# Altium PCB V3.2_Board.PcbDoc (part 9 of 9)
Units mil, origin at the board's own origin, x right, y up, seen from the top; angles counter-clockwise.
Board outline 7795.28 x 4881.89 mil, 2 copper layers (Top Layer, Bottom Layer), stack 57 mil thick; 419 components, 273 nets, 1244 pads, 414 vias.
Unrouted connection lines stored in the file: 3.
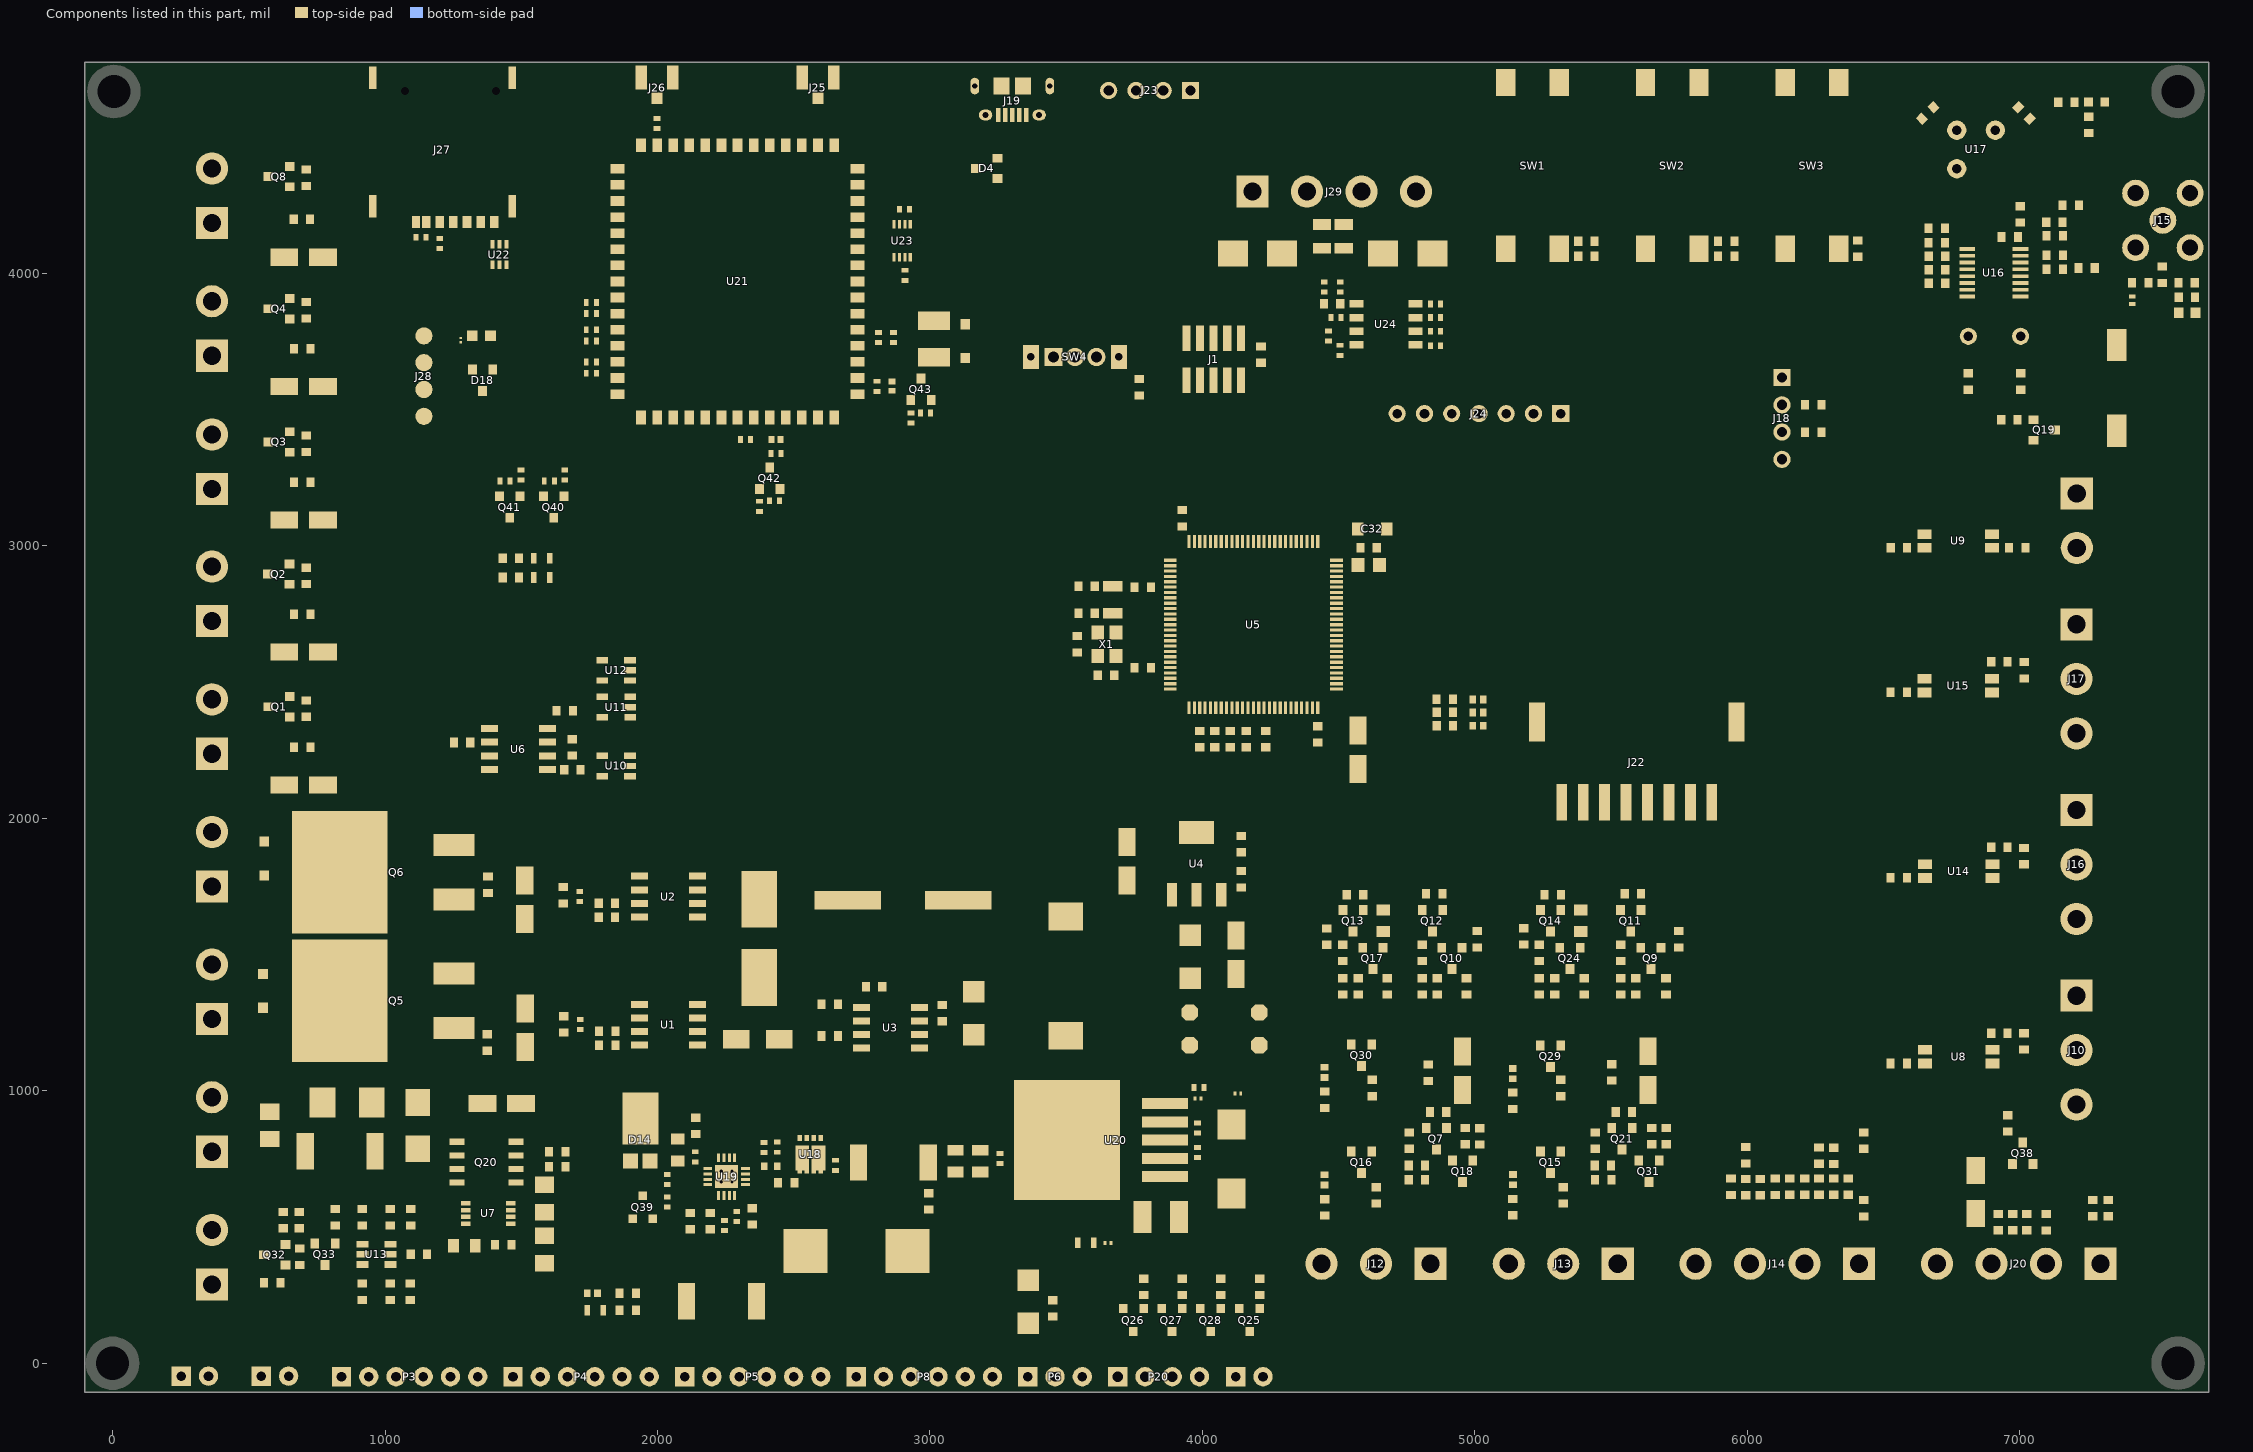
[diagram p5: the components of this part, seen from the top]

## Other copper
Top Layer:
  rectangle net 3V3: 3898.5,2992.02 3954.13,3086
  rectangle net 3V3: 3460.65,1862.08 3599.76,2437.64
  rectangle net 3V3: 6934.78,895 6983.99,1018
  rectangle net 5V: 2810,1364.5 2844,1576
  rectangle net 5V: 2810,1519.22 3005,1576
  region net GND: 1962.09,4762.02 1916.85,4762.02 1916.85,4663.07 1962.09,4663.07
  region net GND: 2556.1,4762.02 2510.86,4762.02 2510.86,4675.41 2556.1,4675.41
  rectangle net GND: 4026.04,3679.48 4232.55,3701.89
  rectangle net GND: 4197.55,3650 4232.55,3701.89
  rectangle net GND: 4197.55,3650 4638,3679.48
  region net GND: 5923.3,2124.93 5771.31,2124.93 5771.31,1986 5923.3,1986
  rectangle net VCC: 5265,1986 5416.98,2124.93
  rectangle net GND: 4717.62,4221.26 4898.72,4358.3
  region net GND: 5148.56,4358.3 4778.1,4358.3 4778.1,3959 5148.56,3959
  rectangle net GND: 3926.04,4025.27 4166.57,4119.76
  region net GND: 3955.96,4119.76 3926.04,4119.76 3926.04,3714.3 3955.96,3714.3
  region net GND: 4105.96,4119.76 4026.04,4119.76 4026.04,3686.89 4105.96,3686.89
  region net 3V3: 4864.72,3937 4864.72,3721.5 4892.28,3721.5 4892.28,3937
  rectangle net RS485/RS232/T.TXD/RS485/RS232/T: 4673.02,3873.7 4853.38,3901.26
  rectangle net 3V3: 4556,3696.5 4590.34,3732
  region net GND: 4523.14,3670 4523.14,3708.02 4450.16,3708.02 4450.16,3670
  region net 3V3: 4479.66,3850.98 4126.04,3850.98 4126.04,3818.98 4479.66,3818.98
  rectangle net GND: 4450.16,3690.02 4475.16,3763
  rectangle net NetR61_1: 4396,3869.98 4461.16,3940
  region net NetR87_1: 4522.16,3820.48 4522.16,3940 4490.16,3940 4490.16,3820.48
  region net NetR87_1: 4590.34,3851.74 4499.54,3851.74 4499.54,3820.48 4590.34,3820.48
  region net NetR61_1: 4590.34,3801.26 4450.16,3801.26 4450.16,3773.7 4590.34,3773.7
  region net 3V3: 4590.34,3751.26 4492.66,3751.26 4492.66,3723.7 4590.34,3723.7
  rectangle net RS485/RS232/T.RXD/RS485/RS232/T: 4755.7,3683 4846.5,3751.26
  rectangle net RE/DE/RS485/T: 4710,3773.7 4846.5,3851.26
  region net NetD5_2: 4473.06,4135.51 4229.73,4135.51 4229.73,3959 4473.06,3959
  rectangle net NetD8_2: 4484.67,3959 4728,4135.51
  rectangle net 3V3: 4126.04,3714.3 4232.55,3850.98
  rectangle net GND: 3691.76,1677.04 3906.56,1822.71
  rectangle net CII: 2647.11,1293.47 2780,1399.5
  rectangle net VCC#P: 668.5,530.04 744.62,595.28
  rectangle net VCC#P: 1444.38,624.36 1620,793.5
  rectangle net VCC#P: 1452.46,665.52 1507.58,837.96
  rectangle net VCC#12: 2212,1155.9 2374.02,1222.83
  rectangle net VCC: 1587,807.34 1677,866.55
  rectangle net VCC#P: 1443.87,751.52 1550.29,984.86
  rectangle net RST_GSM: 2394.32,3270 2429.75,3491.79
  rectangle net 3V3: 4390,1765 6540.57,1968
  region net NetQ33_1: 835.68,520.93 800.68,520.93 800.68,420.86 835.68,420.86
  rectangle net GND: 5937.41,4041.19 6174.12,4079.86
  rectangle net GND: 5424.05,4041.19 5661.34,4079.86
  rectangle net GND: 2035,4675.41 2077.78,4762.02
  rectangle net GND: 726.23,420.58 773.81,457.08
  rectangle net GND: 2580.92,1299.86 2621.92,1687
  rectangle net GND: 3685.45,598.91 3813.4,635
  rectangle net GND: 3746.47,477.07 3813.4,635
  rectangle net 3V3: 3320.74,107.25 3550,185.99
  rectangle net BAT: 306,679 738.54,853
  rectangle net CRNT_SNS.IP+_2: 1359.33,1916 1419,1989.52
  rectangle net CRNT_SNS.IP+_1: 1364,1426 1419,1510
  rectangle net VCC#P: 1444.38,579.58 1480.02,837.96
  rectangle net WBUS2: 5573.5,1398 5662.14,1464.26
  region net GND: 4976.72,1414.63 4976.72,1445.65 4959.01,1445.65 4959.01,1414.63
  rectangle net VCC: 553.52,2558.5 701,2667.19
  rectangle net SW_2: 5787.32,4041.19 5907.41,4139.61
  rectangle net GND: 3120,4640 3490,4675.81
  rectangle net GND: 3188.25,4656.83 3292.68,4717.85
  rectangle net GND: 3195,4656.83 3416.64,4717.85
  rectangle net GND: 2623.54,4675.41 2668.78,4762.02
  rectangle net GND: 2509.97,4660 2556.1,4690
  rectangle net GND: 2623.54,4660 2668.78,4685
  rectangle net GND: 2035,4660 2077.86,4685
  rectangle net GND: 1919.51,4660 1961.21,4690
  rectangle net GND: 1910,4448.48 1961.23,4675
  rectangle net GND: 2035,4415 2095,4675
  rectangle net GND: 710,2730 775,2795
  rectangle net GND: 941.22,4718.57 1480.59,4764.23
  rectangle net GND: 3523.61,2506.86 3639.27,2623.36
  rectangle net VCC: 2110.92,1254.24 2268,1487
  rectangle net S_VIN: 1776,683.5 2023.5,769.2
  rectangle net S_VIN: 1900.88,683.5 2048.5,701.5
  rectangle net 5V: 2981.62,1519.22 3561.1,1733
  rectangle net 5V: 3435.12,1519.56 4161.31,1638.87
  rectangle net VCC: 5056,527.89 5156.5,557.89
  rectangle net NetLED4_1: 5121.5,587.89 5156.5,667.39
  rectangle net 3V3: 4725,1398 4824.47,1491
  rectangle net 3V3: 4390,1571 4474.5,1627
  rectangle net 3V3: 5437,1398 5552.47,1491
  rectangle net 3V3: 5437,1398 5477,1800
  rectangle net 3V3: 4715,1398 4750,1800
  rectangle net VCC: 5419.79,950.95 5809,1054.32
  rectangle net VCC: 5419.79,823.74 5542,1054.32
  rectangle net 3V3: 5112,1581.28 5179,1800.28
  rectangle net 3V3: 5112,1571.28 5196.5,1627.28
  rectangle net 5V: 4050.26,1519.56 4161.31,1761.68
  rectangle net 3V3: 3462,1862.08 3978.41,1990.03
  rectangle net 3V3: 3932.11,1677.04 4026,1950
  rectangle net GND: 3900.61,1362.08 4161.31,1480.68
  rectangle net BAT: 2392.32,514.64 2442.88,632.04
  rectangle net GSM_PWR: 4135.51,915.14 4157.5,997.91
  rectangle net GND: 3969.36,782.62 3994.36,818.99
  rectangle net GSM_BUCK_EN: 3880.33,477.07 3947.26,677.5
  rectangle net GSM_BUCK_EN: 3777.69,665.05 3947.76,752.06
  rectangle net GSM_BUCK_EN: 3931.98,731.98 3994.36,763.62
  rectangle net NetC81_2: 2049.88,722.64 2201.02,748.14
  rectangle net NetC81_2: 2168.74,708.81 2201.02,748.14
  rectangle net AGND: 1967,160.07 2138.54,514.19
  rectangle net DRV_OUTB1: 1351.73,2316.38 1422.26,2341.97
  rectangle net VCC: 556,2070.54 701,2173.53
  rectangle net VCC: 630.13,2223.5 691,2292.64
  rectangle net VCC: 622,2696 691,2785.5
  rectangle net GSM_PWR: 2713.22,3773.59 3147.38,3869.74
  rectangle net GSM_PWR: 2713.22,3773.59 3147.38,3810.69
  region net GND: 4421.57,2286.33 4390.55,2286.33 4390.55,2268.61 4421.57,2268.61
  rectangle net 3V3: 5017.99,2325.83 5096,2483
  rectangle net GND: 5709.17,1404.52 5735.2,1422.24
  rectangle net VCC: 6929.97,1868.55 7133,1943
  rectangle net VCC: 444,4035.65 600.11,4083.17
  rectangle net VCC: 434.11,3561.54 600.11,3609.07
  rectangle net VCC: 434.11,3071.54 600.11,3119.07
  rectangle net VCC: 556,2586.5 600.11,2634.03
  rectangle net VCC: 556,2098.54 600.11,2146.07
  rectangle net GND: 5218.5,1338 5552.5,1368
  region net GND: 5438.37,734.06 5407.35,734.06 5407.35,716.34 5438.37,716.34
  region net GND: 4755.67,734.06 4724.65,734.06 4724.65,716.34 4755.67,716.34
  rectangle net VCC: 4359.42,526 4465.86,558
  rectangle net VCC: 5570.73,1311.06 5718.9,1368.25
  rectangle net VCC: 6930.18,2550.09 7123,2611.95
  rectangle net VCC: 6929.97,1188 7127,1248.29
  rectangle net VCC: 2212,1297 2268,1799
  rectangle net VCC: 2115.03,1723.36 2268,1966
  rectangle net ANT: 7046,3947.5 7427,3982.5
  rectangle net MEM_SAVER: 365.05,3360.5 593.43,3450.5
  rectangle net GND: 4625,2976.06 4706,3085.43
  rectangle net VDDA: 4502.01,2940.96 4595,2976.06
  rectangle net VDDA: 4468.48,2943.25 4595.25,3085.43
  rectangle net 5V: 1702.93,2142.6 1818.89,2195.67
  rectangle net 3V3#: 7195,3997.11 7232,4267
  rectangle net CRNT_VOUT.VIOUT2: 1635.92,1669.75 1799.64,1704.75
  rectangle net CRNT_VOUT.VIOUT1: 1637.92,1198.47 1800.64,1235.75
  rectangle net LED_SIG.R_CNTRL: 3766.73,185.11 3801.73,265
  rectangle net TDS_IN.TEMP_SNS: 4214.75,2305.85 4249.75,2335.85
  rectangle net IO_C9: 5010.06,847.27 5026.71,896
  rectangle net HEAT_CNTRL: 5694.52,848.27 5711.16,897
  rectangle net GND: 1823.45,3440.61 1957.31,3574.47
  rectangle net XOUT: 3658.95,2506.86 3706.2,2620.65
  rectangle net XIN: 3523.61,2653.36 3639.27,2707.26
  rectangle net OSC_OUT: 3590,2732.95 3706.43,2772.32
  rectangle net OSC_IN: 3590,2831.38 3706.43,2870.75
  rectangle net ENA#: 1351.73,2163.17 1672.93,2193.17
  rectangle net 5V: 1836,2171.6 1857.41,2517.44
  region net VDD_EXT: 2897.45,4266 2879.45,4266 2879.45,4236 2897.45,4236
  region net GND: 2862.68,3983.35 2862.68,3965.35 2910.32,3965.35 2910.32,3983.35
  rectangle net GND: 1274,3727.56 1283.45,3746.98
  rectangle net STATUS: 1647.01,3268.86 1690,3286.86
  rectangle net NETLIGHT: 1487.01,3268.86 1530,3286.86
  rectangle net GND: 2623.54,4420 2673,4675
  rectangle net NetQ41_1: 1450.35,3225.36 1511.65,3250.36
  rectangle net NetQ40_1: 1612.5,3225.5 1672.65,3250.5
  rectangle net GND: 2955.94,3658.61 3147.38,3754.59
  rectangle net NetLED12_1: 1476,2863.88 1555.32,2903.25
  rectangle net GSM_PWR: 1417,2866.07 1447,2971.5
  rectangle net NetLED13_1: 1475,2934.31 1555.32,2973.69
  rectangle net NetQ43_1: 2913.51,3474.64 2973.11,3499.64
  rectangle net GND: 2988.32,3474.64 3020.6,3553.6
  rectangle net NetQ43_1: 2913.51,3478.14 2945.8,3553.6
  rectangle net GND: 2713.22,3539.03 2874.56,3575.86
  rectangle net PWRKEY: 2713.22,3594.86 3063.2,3633.52
  rectangle net NetQ41_1: 1479.37,3163.62 1511.65,3246.86
  rectangle net GND: 1565.57,3163.62 1597.85,3250.5
  rectangle net NetQ40_1: 1640.37,3163.62 1672.65,3246.86
  rectangle net GND: 1404.57,3163.62 1436.85,3250.36
  rectangle net GND: 2713.22,3657.14 3147.38,3754.59
  rectangle net GND: 941.22,4204.79 1034,4763
  rectangle net GND: 1453.03,4204.79 1480.59,4752
  rectangle net GND: 2505.53,4415 2556.1,4675
  rectangle net NetQ42_1: 2358.57,3154.5 2390.85,3227.1
  rectangle net NetQ42_1: 2358.57,3153 2420.25,3178
  rectangle net GND: 2433.37,3153 2465.65,3227.1
  rectangle net GND: 2276.21,3377.89 2314.11,3491.79
  rectangle net VDD_EXT: 2333.11,3377.86 2370.7,3491.79
  rectangle net GND: 2441.02,3190.88 2465.65,3403.35
  rectangle net NetC98_2: 1766.61,3657.14 1874.63,3687.36
  rectangle net NetC97_2: 1766.61,3775.25 1874.63,3810.69
  rectangle net NetC98_2: 1766.61,3621.02 1784.61,3687.36
  rectangle net NetD17_2: 1142.73,3758.67 1339.95,3783.5
  rectangle net GND: 1729.61,3780.47 1747.61,3864.52
  rectangle net NetC97_2: 1766.61,3739.13 1784.61,3805.47
  rectangle net NetC96_2: 1766.61,3839.86 1784.61,3905.86
  rectangle net NetC96_2: 1766.61,3834.31 1874.63,3869.74
  rectangle net SIM_VDD: 1142.06,4119.08 1216.81,4144.86
  rectangle net SIM_CD: 1098.66,4119.08 1128.66,4205.31
  rectangle net SIM_VDD: 1185.32,4119.08 1216.81,4205.31
  region net GND: 5606.97,1533.37 5580.94,1533.37 5580.94,1515.65 5606.97,1515.65
  region net GND: 5532.97,1671.61 5501.94,1671.61 5501.94,1653.9 5532.97,1653.9
  region net GND: 5238.71,1671.61 5207.68,1671.61 5207.68,1653.9 5238.71,1653.9
  region net GND: 4805.34,1671.61 4774.31,1671.61 4774.31,1653.9 4805.34,1653.9
  region net GND: 4513.97,1666.61 4482.94,1666.61 4482.94,1648.9 4513.97,1648.9
  region net GND: 4876.67,1533.37 4852.65,1533.37 4852.65,1515.65 4876.67,1515.65
  rectangle net NetQ12_3: 4789.47,1566.28 5026.5,1602.5
  region net GND: 5234.37,1360.48 5203.35,1360.48 5203.35,1342.76 5234.37,1342.76
  region net GND: 4507.12,1351.37 4507.12,1320.35 4524.84,1320.35 4524.84,1351.37
  region net GND: 5238.57,1174.48 5207.54,1174.48 5207.54,1156.76 5238.57,1156.76
  region net GND: 4544.97,1178.06 4513.94,1178.06 4513.94,1160.35 4544.97,1160.35
  region net GND: 5238.97,784.85 5207.94,784.85 5207.94,767.13 5238.97,767.13
  rectangle net 3V3: 7142.21,4169.5 7172.21,4266.5
  region net VCC: 7284.61,600.99 7284.61,648.72 7249.61,648.72 7249.61,600.99
  region net VCC: 6445.5,600.63 6445.5,648.36 6410.5,648.36 6410.5,600.63
  rectangle net TXIN2: 5519.83,1714.5 5565,1732
  rectangle net TXIN1: 4790.83,1714.5 4836,1732
  rectangle net VCC#M: 1165.28,543 1251.11,570.53
  rectangle net VCC#M: 1165.28,543 1208,723.96
  rectangle net VCC#M: 931.46,701.52 1291.05,844.93
  rectangle net 5V: 1775.99,2358.96 1857.82,2382.58
  rectangle net INB_1#: 1564.33,2316.38 1645,2457.39
  rectangle net GND: 1675,2266.38 1705.43,2412.5
  rectangle net 5V: 1775.58,2142.6 1857.41,2195.22
  rectangle net 5V: 1773.58,2493.82 1855.42,2517.44
  rectangle net INA_1#: 1564.33,2214.86 1705.43,2244.86
  rectangle net GND: 1564.33,2266.38 1705.43,2304.86
  rectangle net ENA#: 1773.58,2554.84 1818.89,2592.24
  rectangle net 5V: 1298,2266.38 1414.72,2291.97
  rectangle net VOUT_B: 510.82,-84.9 681.68,-12.03
  rectangle net VOUT_A: 216.82,-84 389,-12.03
  rectangle net NetD6_2: 904.31,900.88 1165.28,1011.12
  rectangle net NetLED11_1: 3591.69,422.31 3648.49,461.69
  rectangle net AGND: 2126,418 2303,460
  rectangle net AGND: 2278.29,477.64 2303.29,529.14
  rectangle net AGND: 2233.26,437 2303.29,495.64
  rectangle net PH: 2591.6,814.83 2607.34,855.83
  rectangle net NetC41_2: 1870.96,802.64 2099.88,842.64
  rectangle net NetC41_2: 2565.69,736.64 2675.38,799.84
  rectangle net PH: 2487.88,431 2548.29,799.84
  rectangle net NetR122_1: 2103.38,536.64 2201.02,566.64
  rectangle net NetSB7_1: 1444.38,417.86 1479.11,511.08
  rectangle net IN-: 997.27,277.43 1041.36,374.4
  rectangle net NetC87_1: 2706.43,510 2769.42,803.57
  rectangle net BAT: 2962.34,761.14 3269.38,876
  rectangle net BAT: 2962.34,609 3025.33,803.57
  rectangle net VREF: 2243.93,599.76 2263.62,632.04
  rectangle net NetLED10_2: 2218.74,584.02 2229.76,632.04
  rectangle net AGND: 1967,485 2048.5,582.26
  region net GND: 4102.5,997.91 4102.5,980.62 4124.49,980.62 4124.49,997.91
  region net ADJ: 3977.85,932.77 3977.85,1024.62 3777.69,1024.62 3777.69,932.77
  region net GSM_PWR: 4105.36,865.84 4105.36,906 3742,906 3742,865.84
  region net GND: 3994.36,782.62 3994.36,853.87 3668,853.87 3668,782.62
  rectangle net GND: 2929.62,1293.47 3199.37,1403.47
  rectangle net GND: 2319.06,1598.53 2820.6,1807.19
  rectangle net GSM_BUCK_EN: 2397.64,1193.47 2553.11,1519.79
  rectangle net NetC20_2: 2929.62,1240.36 3063.5,1270.36
  rectangle net GSM_BUCK_EN: 2397.64,1236.78 2780.02,1276.36
  rectangle net "IPK SNS": 2717.02,1143.47 2780.02,1219.06
  rectangle net NetD1_1: 2929.62,1193.47 3187.48,1219.06
  rectangle net "IPK SNS": 2717.02,1143.47 2992.62,1169.06
  rectangle net "IPK SNS": 2647.11,1143.47 2780.02,1219.06
  rectangle net GND: 4125.61,1791.36 4160.61,1890.39
  rectangle net 3V3: 4013.99,1905.39 4451,1990
  rectangle net NetD1_1: 3120.63,1150.68 3561.1,1254.36
  rectangle net GSM_BUCK_EN: 2397.64,1155.9 2617.11,1271.36
  rectangle net NetQ39_3: 1930.2,598.83 2048.5,664.5
  rectangle net NetQ39_3: 2023.5,609.26 2048.5,664.5
  rectangle net 5V: 1483.14,1109.43 1967.49,1136.36
  rectangle net VREF: 2176.38,476.64 2211.38,523.64
  rectangle net GND: 3059.88,681.64 3354,742.14
  rectangle net VCC#12: 537.42,529.92 644.5,595.28
  rectangle net VCC_M: 609.5,405.43 715.5,510
  rectangle net VSS: 1550.11,437.36 1620.11,584.36
  rectangle net SHDN: 1311.11,406.36 1419.11,456.36
  rectangle net GATE: 1278.59,587.85 1313.59,673.96
  rectangle net VCC#M: 1234.11,553.99 1313.59,570.53
  rectangle net VSS: 1444.38,528.36 1569.53,544.94
  rectangle net VCC#M: 1235.93,502.81 1313.59,519.35
  rectangle net VCC#M: 1235.93,715.52 1291.05,837.96
  rectangle net VCC#M: 1231.11,424.36 1271.11,570.53
  region net NetQ32_1: 795.92,378.34 616.16,378.34 616.16,342.12 795.92,342.12
  region net VCC#12: 573.64,570 537.42,570 537.42,277.5 573.64,277.5
  region net IN+: 939,374.4 894.91,374.4 894.91,277.43 939,277.43
  region net VOUT_A: 939,520.93 859,520.93 859,424.8 939,424.8
  region net IN-: 1110,307.43 997.27,307.43 997.27,277.43 1110,277.43
  region net VCC_M: 1111.77,411.8 997.27,411.8 997.27,386 1111.77,386
  region net VCC_M: 1111.77,520.93 1076.77,520.93 1076.77,381.93 1111.77,381.93
  region net VOUT_B: 1041.36,520.93 959,520.93 959,424.8 1041.36,424.8
  rectangle net NetC87_1: 2920.33,330.93 3015,578.64
  rectangle net NetC87_1: 2706,330.93 2945.56,578.64
  rectangle net BAT: 2330.38,477.64 2442.88,523.64
  rectangle net BAT: 2380.45,477.64 2404.07,659.15
  rectangle net NetR127_1: 2277.79,568.64 2365.38,632.04
  rectangle net BAT: 2306.53,650.76 2392.26,659.15
  rectangle net NetC41_2: 2565.69,696.72 2616.48,799.84
  rectangle net VREF: 2176.38,508.64 2253.93,523.64
  rectangle net NetR127_1: 2277.79,548.14 2365.38,583.64
  rectangle net VREF: 2248.42,508.64 2259.45,632.04
  rectangle net NetR122_1: 2183.88,536.64 2201.02,655.27
  rectangle net GND: 2122.38,758.72 2183.78,859.64
  rectangle net RESIN_SAVER: 365.05,4336.5 593.43,4426.5
  rectangle net FILL_CNTRL: 632.26,2351.38 728.5,2387.52
  rectangle net GND: 632.26,2417.52 728.5,2462.54
  rectangle net GND: 631.26,2904.52 728.5,2949.54
  rectangle net FLUSH_CNTRL: 631.26,2838.38 728.5,2874.52
  rectangle net MEM_CNTRL: 632.26,3323.38 728.5,3359.52
  rectangle net GND: 632.26,3389.52 728.5,3434.54
  rectangle net GND: 632.26,3879.52 728.5,3924.86
  rectangle net PM_CNTRL: 632.26,3813.38 728.5,3849.52
  rectangle net RS_CNTRL: 632.26,4299.84 728.5,4335.98
  rectangle net GND: 632.26,4365.98 728.5,4408.54
  rectangle net AUTO_FILL: 365.05,2388.5 593.43,2478.5
  rectangle net AUTO_FLUSH: 365.05,2875.5 593.43,2965.5
  rectangle net PROP_MIXING: 365.05,3849.5 593.43,3939.86
  rectangle net 3V3: 3323.82,156 3467.5,185.99
  rectangle net LED_SIG.W_LED_CNTRL: 4193.14,185.11 4228.14,265
  rectangle net B_CNTRL: 4049.73,185.11 4084.73,265
  rectangle net G_CNTRL: 3908.23,185.11 3943.23,265
  rectangle net NetQ24_1: 5383.5,1398 5418.5,1603.76
  rectangle net 3V3: 4390,1581 4457,1800
  rectangle net 3V3: 5160.96,1581 5196.5,1627
  rectangle net 3V3: 4439.5,1581 4474.5,1627
  rectangle net WBUS2: 5307.5,365 5342.5,601
  rectangle net WBUS1: 4620.5,365 4655.5,601
  rectangle net WBUS1: 4638,1643.76 4688,1740.5
  rectangle net WBUS2: 5363,1643.76 5413,1736.5
  rectangle net NetQ17_3: 4485,1701.5 4545,1736.5
  rectangle net WBUS1: 4844.66,1398 4931.84,1464.26
  rectangle net NetQ24_3: 5211,1701.5 5271,1736.5
  rectangle net NetQ24_3: 5275.5,1398 5365.14,1464.26
  rectangle net NetQ17_3: 4554.5,1398 4641.69,1464.26
  rectangle net NetQ9_1: 5667.26,1506.78 5765.5,1543
  rectangle net NetQ11_3: 5517.5,1566.28 5765.5,1602.5
  rectangle net NetQ11_3: 5517.5,1521 5555.86,1602.5
  rectangle net NetQ11_1: 5593.26,1645.02 5625.54,1740.5
  rectangle net NetQ12_1: 4865.63,1645.02 4897.91,1740.5
  rectangle net NetQ12_3: 4789.47,1521 4828.23,1602.5
  rectangle net NetQ10_1: 4935.6,1506.78 5026.5,1543
  rectangle net VCC: 4843,1315.33 5009,1368.12
  rectangle net NetQ24_1: 5363,1506.78 5413,1603.76
  rectangle net NetQ14_1: 5299,1645.02 5331.28,1736.5
  rectangle net RXIN2#: 5161.5,1521 5253.5,1551.28
  rectangle net RXIN2: 5218.5,1397 5253.5,1491
  rectangle net NetQ17_1: 4638,1506 4695.44,1603.76
  rectangle net NetQ13_1: 4574.26,1645.02 4606.54,1736.5
  rectangle net RXIN1#: 4439.5,1521 4533.1,1551
  rectangle net NetQ17_1: 4660.44,1398 4695.44,1543
  rectangle net GND: 4498.1,1338 4824.5,1368
  rectangle net RXIN1: 4498.1,1398 4533.1,1491
  rectangle net IND3: 5124.83,1069.15 5293.74,1105.37
  rectangle net IND4: 4434.19,1072.74 4600.14,1108.96
  rectangle net NetLED6_1: 5121.5,978 5156.5,1056.54
  rectangle net NetLED7_1: 4431.42,982 4466.42,1060.54
  rectangle net IND2: 5125.39,679.52 5294.14,715.74
  rectangle net NetLED5_1: 4430.86,586.89 4465.86,666.39
  rectangle net IND1: 4434.19,679.52 4600.14,715.74
  rectangle net NetQ21_1: 5561,845 5593.54,939.5
  rectangle net NetQ31_1: 5685.04,725.58 5720.04,817.62
  rectangle net NetQ31_3: 5631.5,664.95 5646.5,818.27
  rectangle net NetQ18_3: 4947.5,664.95 4962.5,818.27
  rectangle net AUX_HEATER: 5422.5,772.27 5561.91,802.48
  rectangle net GND: 4739.3,656.08 4772.3,743.08
  rectangle net GND: 5425,656.08 5456,743.08
  rectangle net HEATER: 4798.23,334.59 4874.91,802.48
  rectangle net AUX_HEATER: 5485.23,334.59 5561.91,802.48
  rectangle net VCC: 4729.74,950.95 4986.5,1062.47
  rectangle net HEATER: 4742.3,772.27 4874.91,802.48
  rectangle net VCC: 4729.74,821.84 4864.77,1043
  rectangle net NetQ7_1: 4879.77,845 4912.32,939.5
  rectangle net NetQ18_1: 5001.04,725.58 5036.04,817.62
  rectangle net NetJ14_2: 6192,365 6227.61,633.36
  rectangle net NetR115_1: 6299.17,772 6445.5,807
  rectangle net NetJ14_1: 6373.61,365 6447.17,554.36
  rectangle net NetR111_1: 5976.37,661.36 6011.37,748
  rectangle net NetC79_2: 6245.5,716 6334.17,747
  rectangle net NetC79_2: 6299.17,663.36 6334.17,743
  rectangle net 0-10V: 6192.61,663.36 6280.5,693.36
  rectangle net 4-20mA: 6030.33,661.36 6173.28,693.36
  rectangle net NetC42_1: 5922.5,601.36 6065.33,632.36
  rectangle net NetJ14_2: 6138.28,603.36 6227.61,633.36
  rectangle net NetR112_2: 6245.5,603.36 6387.5,633.36
  rectangle net NetQ38_1: 6955.78,533 6990.78,749.74
  rectangle net NetJ20_2: 7063,368 7130,503
  rectangle net PSW_MCU: 6863,368 6930,503
  rectangle net PSW_MCU: 6804.54,473 6871.46,549.26
  rectangle net PSW_MCU: 6804.54,473 7042.63,503
  rectangle net SW_1: 5274.55,4041.19 5394.05,4139.61
  rectangle net NetJ18_3: 6127.11,3399.86 6227.11,3434.86
  rectangle net NetJ18_2: 6127.11,3499.86 6227.11,3534.86
  rectangle net FLOW_MCU1: 6577.36,1082.17 6676.94,1117.39
  rectangle net FLOW_MCU2: 6570.57,1763.17 6676.94,1799.39
  rectangle net FLOW_MCU3: 6575.57,2444.22 6675.15,2479.43
  rectangle net FLOW_OUT1: 6873.79,1132.03 7208.11,1167.61
  rectangle net FLOW_OUT2: 6874.06,1813.36 7208.11,1848.36
  rectangle net FLOW_OUT3: 6873,2494 7208.11,2529.7
  rectangle net LEVEL_IN: 7005.36,2975.36 7209.11,3010.36
  region net LEVEL_MCU: 6576.36,3010.61 6576.36,2975.17 6675.94,2975.17 6675.94,3010.61
  region net NetR80_1: 6872.79,3010.61 6872.79,2975.17 6975.36,2975.17 6975.36,3010.61
  rectangle net NetQ19_1: 6976.61,3444.9 7068.74,3479.9
  rectangle net NetLS1_2: 7111.26,3362.94 7391.43,3484
  rectangle net RO1: 6985.56,3618 7020.56,3921.39
  rectangle net RO2: 6793.56,3618 6828.56,3921.39
  rectangle net GND: 6651,3945.5 6681,4030.17
  rectangle net SEL1: 6710,4044.5 6741,4130.5
  rectangle net SHDN#: 6973.9,4082.61 7030.98,4201
  rectangle net SEL0: 7082.21,4119.72 7113.21,4204.5
  rectangle net 3V3#: 7143.21,3997.11 7230,4032.11
  rectangle net GND: 7143.21,4048.11 7173.21,4133.72
  rectangle net PATCH: 7564.96,3836.91 7600.4,3930.15
  rectangle net NetC77_2: 7627,3895.15 7658,3982.5
  rectangle net ANT: 6973.9,3957.61 7061.21,3971.39
  rectangle net NetJ15_1: 7505.5,4010 7540.5,4194.36
  rectangle net ANT#: 7457,3947.5 7597,3982.5
  rectangle net NetR5_1: 1830.64,1200.75 1966.53,1235.75
  rectangle net NetQ6_1: 1178.66,1662 1398,1742.48
  rectangle net NetQ5_1: 1178.66,1189 1398,1271.47
  rectangle net VCC: 2115.14,1255.46 2178.13,1331.05
  rectangle net 5V: 1830.64,1109.43 1967.49,1184.75
  rectangle net 5V: 1829.64,1578.43 1965.53,1653.75
  rectangle net 5V: 1481.19,1578.43 1965.53,1605.36
  rectangle net GND: 1483.14,1251.16 1966.85,1353.52
  rectangle net GND: 1481.19,1720.16 1965.53,1822.52
  rectangle net 5V: 1858.19,1149.75 1965.53,1184.75
  rectangle net NetR8_1: 1829.64,1669.75 1965.53,1704.75
  rectangle net 5V: 1857.19,1618.75 1965.53,1653.75
  rectangle net GND: 1902.54,1724.46 1965.53,1800.05
  rectangle net VCC: 2115.14,1724.46 2178.13,1800.05
  rectangle net GND_DRV_2: 306,1576.53 1008.58,1809.09
  rectangle net GND_DRV_1: 306,1105.52 1001.64,1322.04
  rectangle net PS_PWR: 7236.88,305.94 7354.99,554.36
  region net GND: 7638.25,-106.94 7508.07,-106.94 cw(c7508.07,-101.93) 7503.59,-104.18 cw(c7505.79,-99.79) 7502.84,-103.72 cw(c7581.92,2.07) 7581.92,134.15 cw(c7581.92,2.07) 7687.07,81.99 cw(c7683.09,78.96) 7688.1,78.96 7688.1,-106.94
  region net GND: 7688.1,4724.87 7688.1,4594.69 cw(c7683.09,4594.69) 7685.34,4590.21 cw(c7680.95,4592.41) 7684.87,4589.46 cw(c7579.08,4668.53) 7447,4668.53 cw(c7579.08,4668.53) 7499.16,4773.69 cw(c7502.2,4769.71) 7502.2,4774.71 7688.1,4774.71
  region net GND: -52.35,4774.42 77.83,4774.42 cw(c77.83,4769.41) 82.31,4771.66 cw(c80.11,4767.27) 83.06,4771.2 cw(c3.98,4665.41) 3.98,4533.33 cw(c3.98,4665.41) -101.17,4585.49 cw(c-97.19,4588.52) -102.2,4588.53 -102.2,4774.42
  region net GND: -107.18,-57.33 -107.18,72.85 cw(c-102.17,72.85) -104.42,77.33 cw(c-100.03,75.13) -103.95,78.08 cw(c1.84,-1) 133.91,-1 cw(c1.84,-1) 81.75,-106.16 cw(c78.72,-102.17) 78.72,-107.18 -107.18,-107.18
Bottom Layer:
  rectangle net 3V3: 4242,3690 4305,3851
  rectangle net 3V3: 4242,3682 4599,3711.48
  rectangle net VCC: 5760,986 5810,1040
  rectangle net VCC: 2115,1919 2269,1970
  rectangle net GND: 3587.34,3640.86 3634.66,3756.31
  rectangle net BAT: 600.92,679 687,761
  rectangle net CRNT_SNS.IP+_2: 329,1916.05 1417,1990.05
  rectangle net VCC: 2110.5,1378.46 2215,1479.4
  rectangle net VCC: 3113.5,499.91 3248.5,591
  rectangle net BAT: 2382,504.49 3034.93,591
  rectangle net BAT: 2963.55,504.49 3034.93,877
  rectangle net AGND: 2016.47,449 2099.88,523.46
  rectangle net S_VIN: 306,247.43 1871,330
  rectangle net AGND: 2215.01,646.08 2295.03,724.91
  rectangle net CRNT_SNS.IP+_1: 329,1429 1417,1503
  rectangle net VCC: 306,2177.48 424.11,2295.59
  rectangle net S_VIN: 1774,260 1871,754
  region net VOUT_A: 216.82,-11.57 216.82,-82.9 387.68,-82.9 387.68,-11.57
  region net VOUT_B: 510.82,-11.57 510.82,-82.9 681.68,-82.9 681.68,-11.57
  region net GND: 7638.25,-106.94 7508.07,-106.94 cw(c7508.07,-101.93) 7503.59,-104.18 cw(c7505.81,-99.77) 7502.84,-103.72 cw(c7581.92,2.07) 7581.92,134.15 cw(c7581.92,2.07) 7687.07,81.99 cw(c7683.09,78.96) 7688.1,78.96 7688.1,-106.94
  region net GND: 7688.1,4724.86 7688.1,4594.69 cw(c7683.08,4594.69) 7685.34,4590.21 cw(c7680.92,4592.42) 7684.87,4589.46 cw(c7579.08,4668.53) 7447,4668.53 cw(c7579.08,4668.53) 7499.16,4773.69 cw(c7502.2,4769.7) 7502.2,4774.71 7688.1,4774.71
  region net GND: -52.34,4774.42 77.83,4774.42 cw(c77.83,4769.41) 82.31,4771.66 cw(c80.09,4767.25) 83.06,4771.2 cw(c3.98,4665.41) 3.98,4533.33 cw(c3.98,4665.41) -101.17,4585.49 cw(c-97.19,4588.52) -102.2,4588.53 -102.2,4774.42
  region net GND: -107.18,-57.33 -107.18,72.85 cw(c-102.17,72.85) -104.42,77.33 cw(c-100,75.11) -103.95,78.08 cw(c1.84,-1) 133.91,-1 cw(c1.84,-1) 81.75,-106.16 cw(c78.72,-102.17) 78.72,-107.18 -107.18,-107.18
  pour cut-out: 3813.72,2731.52 3834.87,2731.52 3834.87,2677.06 3813.72,2677.06
Multi-Layer:
  pour cut-out: 1935,1370.46 2066.49,1370.46 2066.49,1349.46 1935,1349.46

## Silkscreen, mask and mechanical layers (free items; w line width, h text height)
Top Overlay:
  lines w5: 574.99,769.09 583.91,778 668.21,778 ; 755,575 755,545 764.07,535.93 797.18,535.93 ; 865,599.8 865,550 874.07,540.93 895.95,540.93 ; 975,213.43 975,235 980.74,240.74 998.27,240.74 ; 1019.31,583.93 1019.31,599.8 ; 1939,194 1974.69,194 1984.1,184.59 1984.1,169.34 ; 1939,257 1980,257 1986.14,263.14 1986.14,283.17 ; 2006.95,500 2027.45,520.5 2027.45,560.76 ; 2154.88,778.64 2173.78,778.64 2179.98,784.84 2179.98,803.74 ; 2412,638.8 2412,704.32 ; 2439.88,823.64 2439.88,871 ; 2820.16,3795.59 2820.16,3796.3 2820.16,3835.15 ; 2923.95,3971.85 2948.5,3971.85 ; 3055,3869.55 3055,3891 ; 3164.52,4490.36 3212.11,4490.36 ; 3164.52,4492.27 3164.52,4578.36 ; 3392.11,4490.36 3440.52,4490.36 3440.52,4578.36 ; 3987,894.37 3987,935.13 4004,952.13 4191.65,952.13 ; 4002.36,972.12 4027.12,972.12 ; 4464.99,1645.02 4475.16,1634.85 4492,1634.85 ; 4608,540 4630,540 4638,548 4638,567 ; 4681.44,1687.76 4681.44,1740 ; 4750,1575 4750,1554.99 4763.2,1541.79 4785.97,1541.79 ; 4829,979 4855.32,979 4864.77,969.55 4864.77,943 ; 4836.3,725.58 4854.42,725.58 4865,715 4865,675.32 4865,665 ; 4965,881.27 4965,915 4975,925 4990,925 ; 5018.88,1012.88 5018.88,1011.13 5030,1000 5049.2,1000 ; 5170,1663.02 5170,1645 5178.85,1636.15 5216.74,1636.15 ; 5171.51,1482.06 5171.51,1491.51 5177.61,1497.61 5215,1497.61 ; 5236,1316 5236,1334 ; 5302,545 5319.28,545 5325,550.72 5325,567 ; 5410,1687.76 5410,1730 ; 5450,1049 5450,1037 5453.5,1033.5 5482,1033.5 ; 5490,1581.6 5527.38,1581.6 5535,1573.99 5535,1555 ; 5519,725.58 5542.42,725.58 5553,715 5553,688.05 ; 5527.49,965.51 5540,965.51 5547,958.51 5547,943 ; 5649,881.27 5649,919 5660,930 5682,930 ; 6880,4167 6880,4143 6889.67,4133.33 6914,4133.33 ; 7023,4249.5 7045.23,4249.5 7052.34,4256.61 7052.34,4270 ; 7211.5,3963 7211.5,3993.56
  lines w10: 5085,3668 cw(c5085,3643) 5110,3643 ; 5085,3693 cw(c5085,3643) 5135,3643 ; 5085,3718 cw(c5085,3643) 5160,3643 ; 5085,3743 cw(c5085,3643) 5185,3643 ; 5696,3256 6075.1,3256 6075.1,3682.36 5696,3682.36 5696,3256
  text "ULTRA-SONIC" at 4051,4693.27 h85
  text "MOTION DETETCTION" at 6657.11,4666.36 h55
  text "PHOTO TRANSISTOR" at 7075,4665 h55
  text "MAIN / ANTENNA" at 2684.71,4655 h65
  text "GNSS / ANTENNA" at 1597.71,4653.44 h65
  text "NANO-SIM / JACK" at 624,4651.88 h65
  text "ENCODER" at 3607,4549 h65
  text "RESIN SAVER" at -101.43,4517.53 h65 r270
  text "USB" at 3160.64,4456.36 h65
  text "RF / ANTENNA" at 7363.71,4359.44 h65
  text "-ve" at 495.25,4314.37 h80 r90
  text "+ve" at 4087,4155.68 h80
  text "-ve" at 4687,4155.68 h80
  text "+ve" at 495.24,4114.37 h80 r90
  text "PROP MIXING" at -101.43,4030.53 h75 r270
  text "SWITCH 1" at 5060,3950 h65
  text "SWITCH 2" at 5572.78,3950 h65
  text "RESET" at 6085.56,3950 h65
  text "-ve" at 495.25,3827.37 h80 r90
  text "SOFTWARE" at 3894,3819 h65
  text "+ve" at 495.24,3627.37 h80 r90
  text "NFC" at 5057,3560 h65
  text "MEM SAVER" at -101.43,3541.53 h75 r270
  text "BOOT0 SWITCH" at 3363,3482 h65
  text "BUZZER" at 7681.36,3430 h55 r90
  text "NEAR FIELD COM" at 4664.67,3358 h65
  text "-ve" at 495.25,3338.37 h80 r90
  text "FS10000A  / RX MODULE" at 5809,3257 h65 r90
  text "+ve" at 495.24,3138.37 h80 r90
  text "+ve" at 7127.75,3117.19 h80 r90
  text "AUTO FLUSH" at -101.43,3056.53 h75 r270
  text "NET-LIGHT" at 1654.5,2920.65 h65
  text "-ve" at 7127.75,2913.19 h80 r90
  text "LEVEL SENSOR" at 7680.83,2859.36 h65 r90
  text "-ve" at 495.25,2853.37 h80 r90
  text "STATUS" at 1654.5,2844 h65
  text "+ve" at 495.24,2653.37 h80 r90
  text "+ve" at 7126.75,2632.52 h80 r90
  text "AUTO FILL" at -101.43,2569.53 h85 r270
  text "DATA" at 7125.75,2409.52 h80 r90
  text "-ve" at 495.25,2366.37 h80 r90
  text "-ve" at 7126.75,2232.52 h80 r90
  text "FLOW METER-3" at 7680.83,2184.03 h85 r90
  text "+ve" at 495.24,2166.37 h80 r90
  text "PUMP-2" at -101.43,2083.03 h85 r270
  text "+ve" at 7126.75,1951.19 h80 r90
  text "HMI DISPLAY" at 5271.09,1897.85 h85
  text "+ve" at 495.24,1879.87 h80 r90
  text "DATA" at 7125.75,1728.19 h80 r90
  text "-ve" at 495.25,1679.87 h80 r90
  text "PUMP-1" at -101.43,1595.98 h85 r270
  text "-ve" at 7126.75,1551.19 h80 r90
  text "FLOW METER-2" at 7680.83,1501.7 h85 r90
  text "+ve" at 500.25,1392.43 h80 r90
  text "+ve" at 7126.75,1269.86 h80 r90
  text "5V" at 3767,1258 h80
  text "3V3" at 4022.11,1258 h80
  text "-ve" at 495.25,1192.43 h80 r90
  text "3V8" at 4022,1134.13 h80
  text "GND" at 3750,1134 h80
  text "BATTERY" at -100.85,1107.98 h85 r270
  text "DATA" at 7126.75,1046.86 h80 r90
  text "-ve" at 496.25,910.53 h80 r90
  text "-ve" at 7126.75,869.86 h80 r90
  text "FLOW METER-1" at 7680.83,820.36 h85 r90
  text "+ve" at 496.24,705.92 h80 r90
  text "SOLAR" at -100.85,621.08 h85 r270
  text "DATA" at 4535.11,447.36 h80
  text "DATA" at 5222.11,447.36 h80
  text "-ve" at 4358.11,446.36 h80
  text "+ve" at 4758.11,446.36 h80
  text "-ve" at 5045.11,446.36 h80
  text "+ve" at 5445.11,446.36 h80
  text "-ve" at 5730.94,446.36 h80
  text "+ve" at 6343.61,446.36 h80
  text "-ve" at 6616.77,446.36 h80
  text "+ve" at 7216.44,446.36 h80
  text "-ve" at 496.25,423.64 h80 r90
  text "GSM / POWER" at 3240,386 h65
  text "CHARGING" at 1364,232 h65
  text "+ve" at 496.24,219.02 h80 r90
  text "FULL" at 1531.5,149.12 h65
  text "1" at 814.11,15.36 h35
  text "6" at 1350.25,15.36 h35
  text "1" at 1443.86,15.36 h35
  text "6" at 1980,15.36 h35
  text "1" at 2073.61,15.36 h35
  text "6" at 2609.75,15.36 h35
  text "1" at 2703.36,15.36 h35
  text "6" at 3239.5,15.36 h35
  text "VOUT-A" at 197.25,7.53 h60
  text "VOUT-B" at 491.25,7.53 h60
  text "TDS-1" at 837.11,3.15 h85
  text "TDS-2" at 1466.86,3.15 h85
  text "TDS-3" at 2096.61,3.15 h85
  text "TDS-4" at 2726.36,3.15 h85
  text "DS18B20" at 3307.25,3.15 h75
  text "RGB LED" at 3637.25,3.15 h85
  text "W-LED" at 4054.25,3.15 h75
  text "MAIN-HEATER" at 4304.11,-102.48 h85
  text "AUX-HEATER" at 4992.11,-102.48 h85
  text "PRESSURE SENSOR" at 5678.11,-102.48 h85
  text "PRESSURE SWITCH" at 6563.94,-102.48 h85
Bottom Overlay:
  drawing of 16 lines, arcs and shapes, not listed
  text "V3.2 PCB BOARD" at 6954.81,57.03 h80
Board Outline:
  lines w10: 7688.1,-107.18 -107.18,-107.18 -107.18,4774.71 7688.1,4774.71 7688.1,-106.94
Fabrication:
  drawing of 191 lines, arcs and shapes, not listed
  text "Layer" at 7911.34,5674.5 h60
  text "Name" at 8321.26,5674.5 h60
  text "Material" at 9251,5674.5 h60
  text "Thickness" at 10110.77,5674.5 h60
  text "Constant" at 10760.6,5674.5 h60
  text "Board Layer Stack" at 11330.46,5674.5 h60
  text "Top Overlay" at 8321.26,5554.5 h60
  text "Top Solder" at 8321.26,5434.5 h60
  text "Solder Resist" at 9251,5434.5 h60
  text "3.00mil" at 10110.77,5434.5 h60
  text "3.5" at 10760.6,5434.5 h60
  text "1" at 7911.34,5314.5 h60
  text "Top Layer" at 8321.26,5314.5 h60
  text "10.00mil" at 10110.77,5314.5 h60
  text "Dielectric 1" at 8321.26,5194.5 h60
  text "FR-4" at 9251,5194.5 h60
  text "37.00mil" at 10110.77,5194.5 h60
  text "4.8" at 10760.6,5194.5 h60
  text "2" at 7911.34,5074.5 h60
  text "Bottom Layer" at 8321.26,5074.5 h60
  text "10.00mil" at 10110.77,5074.5 h60
  text "Bottom Solder" at 8321.26,4954.5 h60
  text "Solder Resist" at 9251,4954.5 h60
  text "3.00mil" at 10110.77,4954.5 h60
  text "3.5" at 10760.6,4954.5 h60
  text "Bottom Overlay" at 8321.26,4834.5 h60
  text "Total board thickness:" at 7911.34,4714.5 h60
  text "63.00mil" at 10110.77,4714.5 h60
  text "Note:" at -109.89,-524.63 h55
  text "J18 is the header placed for FS10000A Receiver Module and it should be mounted on board with an offset of atleast 3mm from the surface of PCB." at -126.89,-730.28 h55
Drill Drawing:
  circle w10: c-86.38,7609.28 r33.33
  lines w10: -119.71,6392.61 -103.04,6392.61 -86.38,6375.94 -69.71,6392.61 -53.04,6392.61 -69.71,6409.27 -53.04,6425.94 -69.71,6425.94 -86.38,6442.61 -103.04,6425.94 -119.71,6425.94 -103.04,6409.27 -119.71,6392.61 ; -119.71,6542.61 -103.04,6542.61 -103.04,6525.94 -69.71,6525.94 -69.71,6542.61 -53.04,6542.61 -53.04,6575.94 -69.71,6575.94 -69.71,6592.61 -103.04,6592.61 -103.04,6575.94 -119.71,6575.94 -119.71,6542.61 ; -119.71,6675.94 -53.04,6675.94 -53.04,6742.61 -119.71,6742.61 -119.71,6675.94 ; -119.71,6892.61 -53.04,6892.61 -86.38,6825.94 -119.71,6892.61 ; -119.71,6975.94 -86.38,6992.61 -53.04,6975.94 -69.71,7009.27 -53.04,7042.61 -86.38,7025.94 -119.71,7042.61 -103.04,7009.27 -119.71,6975.94 ; -119.71,7142.61 -103.04,7142.61 -86.38,7125.94 -69.71,7142.61 -53.04,7142.61 -69.71,7159.27 -53.04,7175.94 -69.71,7175.94 -86.38,7192.61 -103.04,7175.94 -119.71,7175.94 -103.04,7159.27 -119.71,7142.61 ; -119.71,7275.94 -119.71,7292.61 -103.04,7309.27 -119.71,7325.94 -119.71,7342.61 -103.04,7342.61 -86.38,7325.94 -69.71,7342.61 -53.04,7342.61 -53.04,7325.94 -69.71,7309.27 -53.04,7292.61 -53.04,7275.94 -69.71,7275.94 -86.38,7292.61 -103.04,7275.94 -119.71,7275.94 ; -119.71,7425.94 -119.71,7442.61 -103.04,7459.28 -119.71,7475.94 -119.71,7492.61 -103.04,7492.61 -86.38,7475.94 -69.71,7492.61 -53.04,7492.61 -53.04,7475.94 -69.71,7459.28 -53.04,7442.61 -53.04,7425.94 -69.71,7425.94 -86.38,7442.61 -103.04,7425.94 -119.71,7425.94 ; -119.71,7725.94 -53.04,7725.94 -53.04,7792.61 -119.71,7792.61 -119.71,7725.94 ; -119.71,7909.28 -86.38,7875.94 -53.04,7909.28 -86.38,7942.61 -119.71,7909.28 ; -119.71,8092.61 -53.04,8092.61 -86.38,8025.94 -119.71,8092.61 ; -106.38,7149.27 -96.38,7149.27 -86.38,7139.27 -76.38,7149.27 -66.38,7149.27 -76.38,7159.27 -66.38,7169.27 -76.38,7169.27 -86.38,7179.27 -96.38,7169.27 -106.38,7169.27 -96.38,7159.27 -106.38,7149.27 ; -106.38,7439.28 -106.38,7449.28 -96.38,7459.28 -106.38,7469.28 -106.38,7479.28 -96.38,7479.28 -86.38,7469.28 -76.38,7479.28 -66.38,7479.28 -66.38,7469.28 -76.38,7459.28 -66.38,7449.28 -66.38,7439.28 -76.38,7439.28 -86.38,7449.28 -96.38,7439.28 -106.38,7439.28 ; -106.38,7739.28 -66.38,7739.28 -66.38,7779.28 -106.38,7779.28 -106.38,7739.28 ; -106.38,8079.28 -66.38,8079.28 -86.38,8039.28 -106.38,8079.28
  lines w15: -179.5,6330.94 13348.68,6330.94 ; -179.5,8130.94 13348.68,8130.94 ; 371.38,6180.94 371.38,8280.94 ; 971.22,6180.94 971.22,8280.94 ; 2110.88,6180.94 2110.88,8280.94 ; 2616.76,6180.94 2616.76,8280.94 ; 3350.56,6180.94 3350.56,8280.94 ; 4850.11,6180.94 4850.11,8280.94 ; 5439.96,6180.94 5439.96,8280.94 ; 6185.76,6180.94 6185.76,8280.94 ; 7325.43,6180.94 7325.43,8280.94 ; 8179.19,6180.94 8179.19,8280.94 ; 9512.8,6180.94 9512.8,8280.94 ; 10846.4,6180.94 10846.4,8280.94 ; 11946.08,6180.94 11946.08,8280.94 ; -179.5,6180.94 13348.68,6180.94 13348.68,8280.94 -179.5,8280.94 -179.5,6180.94
  text "Symbol" at -89.5,8175.94 h72
  text "Count" at 416.38,8175.94 h72
  text "Hole Size" at 1016.22,8175.94 h72
  text "Plated" at 2155.88,8175.94 h72
  text "Hole Type" at 2661.76,8175.94 h72
  text "Drill Layer Pair" at 3395.56,8175.94 h72
  text "Via/Pad" at 4895.11,8175.94 h72
  text "Pad Shape" at 5484.96,8175.94 h72
  text "Template" at 6230.76,8175.94 h72
  text "Description" at 7370.43,8175.94 h72
  text "Hole Tolerance (+)" at 8224.19,8175.94 h72
  text "Hole Tolerance (-)" at 9557.8,8175.94 h72
  text "Hole Length" at 10891.4,8175.94 h72
  text "Routed Path Length" at 11991.08,8175.94 h72
  text "1" at 416.38,8025.94 h60
  text "55.12mil (1.400mm)" at 1016.22,8025.94 h60
  text "PTH" at 2155.88,8025.94 h60
  text "Round" at 2661.76,8025.94 h60
  text "Top Layer - Bottom Layer" at 3395.56,8025.94 h60
  text "Pad" at 4895.11,8025.94 h60
  text "Rounded" at 5484.96,8025.94 h60
  text "c250h140" at 6230.76,8025.94 h60
  text "-" at 10891.4,8025.94 h60
  text "-" at 11991.08,8025.94 h60
  text "2" at 416.38,7875.94 h60
  text "19.69mil (0.500mm)" at 1016.22,7875.94 h60
  text "PTH" at 2155.88,7875.94 h60
  text "Slot" at 2661.76,7875.94 h60
  text "Top Layer - Bottom Layer" at 3395.56,7875.94 h60
  text "Pad" at 4895.11,7875.94 h60
  text "Rounded" at 5484.96,7875.94 h60
  text "r80_155h50_115r100" at 6230.76,7875.94 h60
  text "45.28mil (1.150mm)" at 10891.4,7875.94 h60
  text "25.59mil (0.650mm)" at 11991.08,7875.94 h60
  text "2" at 416.38,7725.94 h60
  text "21.65mil (0.550mm)" at 1016.22,7725.94 h60
  text "PTH" at 2155.88,7725.94 h60
  text "Slot" at 2661.76,7725.94 h60
  text "Top Layer - Bottom Layer" at 3395.56,7725.94 h60
  text "Pad" at 4895.11,7725.94 h60
  text "Rounded" at 5484.96,7725.94 h60
  text "r100_125h55_85r100" at 6230.76,7725.94 h60
  text "33.47mil (0.850mm)" at 10891.4,7725.94 h60
  text "11.81mil (0.300mm)" at 11991.08,7725.94 h60
  text "2" at 416.38,7575.94 h60
  text "27.56mil (0.700mm)" at 1016.22,7575.94 h60
  text "PTH" at 2155.88,7575.94 h60
  text "Rectangle" at 2661.76,7575.94 h60
  text "Top Layer - Bottom Layer" at 3395.56,7575.94 h60
  text "Pad" at 4895.11,7575.94 h60
  text "Rectangle" at 5484.96,7575.94 h60
  text "(Mixed)" at 6230.76,7575.94 h60
  text "59.06mil (1.500mm)" at 10891.4,7575.94 h60
  text "59.06mil (1.500mm)" at 11991.08,7575.94 h60
  text "2" at 416.38,7425.94 h60
  text "29.53mil (0.750mm)" at 1016.22,7425.94 h60
  text "NPTH" at 2155.88,7425.94 h60
  text "Round" at 2661.76,7425.94 h60
  text "Top Layer - Bottom Layer" at 3395.56,7425.94 h60
  text "Pad" at 4895.11,7425.94 h60
  text "Rectangle" at 5484.96,7425.94 h60
  text "s0hn75" at 6230.76,7425.94 h60
  text "-" at 10891.4,7425.94 h60
  text "-" at 11991.08,7425.94 h60
  text "3" at 416.38,7275.94 h60
  text "39.37mil (1.000mm)" at 1016.22,7275.94 h60
  text "PTH" at 2155.88,7275.94 h60
  text "Round" at 2661.76,7275.94 h60
  text "Top Layer - Bottom Layer" at 3395.56,7275.94 h60
  text "Pad" at 4895.11,7275.94 h60
  text "(Mixed)" at 5484.96,7275.94 h60
  text "(Mixed)" at 6230.76,7275.94 h60
  text "-" at 10891.4,7275.94 h60
  text "-" at 11991.08,7275.94 h60
  text "4" at 416.38,7125.94 h60
  text "59.06mil (1.500mm)" at 1016.22,7125.94 h60
  text "PTH" at 2155.88,7125.94 h60
  text "Round" at 2661.76,7125.94 h60
  text "Top Layer - Bottom Layer" at 3395.56,7125.94 h60
  text "Pad" at 4895.11,7125.94 h60
  text "Rounded" at 5484.96,7125.94 h60
  text "c250h150" at 6230.76,7125.94 h60
  text "-" at 10891.4,7125.94 h60
  text "-" at 11991.08,7125.94 h60
  text "4" at 416.38,6975.94 h60
  text "122.05mil (3.100mm)" at 1016.22,6975.94 h60
  text "PTH" at 2155.88,6975.94 h60
  text "Round" at 2661.76,6975.94 h60
  text "Top Layer - Bottom Layer" at 3395.56,6975.94 h60
  text "Pad" at 4895.11,6975.94 h60
  text "Rounded" at 5484.96,6975.94 h60
  text "c500h310" at 6230.76,6975.94 h60
  text "-" at 10891.4,6975.94 h60
  text "-" at 11991.08,6975.94 h60
  text "12" at 416.38,6825.94 h60
  text "37.40mil (0.950mm)" at 1016.22,6825.94 h60
  text "PTH" at 2155.88,6825.94 h60
  text "Round" at 2661.76,6825.94 h60
  text "Top Layer - Bottom Layer" at 3395.56,6825.94 h60
  text "Pad" at 4895.11,6825.94 h60
  text "(Mixed)" at 5484.96,6825.94 h60
  text "(Mixed)" at 6230.76,6825.94 h60
  text "-" at 10891.4,6825.94 h60
  text "-" at 11991.08,6825.94 h60
  text "45" at 416.38,6675.94 h60
  text "35.43mil (0.900mm)" at 1016.22,6675.94 h60
  text "PTH" at 2155.88,6675.94 h60
  text "Round" at 2661.76,6675.94 h60
  text "Top Layer - Bottom Layer" at 3395.56,6675.94 h60
  text "Pad" at 4895.11,6675.94 h60
  text "(Mixed)" at 5484.96,6675.94 h60
  text "(Mixed)" at 6230.76,6675.94 h60
  text "-" at 10891.4,6675.94 h60
  text "-" at 11991.08,6675.94 h60
  text "47" at 416.38,6525.94 h60
  text "66.93mil (1.700mm)" at 1016.22,6525.94 h60
  text "PTH" at 2155.88,6525.94 h60
  text "Round" at 2661.76,6525.94 h60
  text "Top Layer - Bottom Layer" at 3395.56,6525.94 h60
  text "Pad" at 4895.11,6525.94 h60
  text "(Mixed)" at 5484.96,6525.94 h60
  text "(Mixed)" at 6230.76,6525.94 h60
  text "-" at 10891.4,6525.94 h60
  text "-" at 11991.08,6525.94 h60
  text "418" at 416.38,6375.94 h60
  text "11.81mil (0.300mm)" at 1016.22,6375.94 h60
  text "PTH" at 2155.88,6375.94 h60
  text "Round" at 2661.76,6375.94 h60
  text "Top Layer - Bottom Layer" at 3395.56,6375.94 h60
  text "(Mixed)" at 4895.11,6375.94 h60
  text "Rounded" at 5484.96,6375.94 h60
  text "(Mixed)" at 6230.76,6375.94 h60
  text "-" at 10891.4,6375.94 h60
  text "-" at 11991.08,6375.94 h60
  text "542 Total" at 416.38,6225.94 h60
  text "Slot definitions :" at -89.5,6080.97 h60
  text "Routed Path Length" at 943.19,6080.97 h60
  text "= Calculated from tool start centre position to tool end centre position." at 2045.86,6080.97 h60
  text "Hole Length" at 943.19,5980.99 h60
  text "= Routed Path Length + Tool Size = Slot length as defined in the PCB layout" at 1635.99,5980.99 h60

## Dimensions
-107.18,4774.71 to 7688.1,4774.71 on Dimensions
-107.18,4774.71 to -107.18,-107.18 on Dimensions

## Text inside footprints (layer, text, board x,y; h text height)
J19: Top Overlay "Board Edge" at 3395.95,4757.08 h19.68 r180
J22: Top Overlay "PCB Edge" at 5767.46,2393.98 h50 r180
J27: Top Overlay "Board Edge" at 1365.91,4722.22 h30 r180